# Altium PCB Relay-Driver10A.PcbDoc (part 1 of 3)
Units mil, origin at the board's own origin, x right, y up, seen from the top; angles counter-clockwise.
Board outline 10588 x 8047 mil, 4 copper layers (Top Layer, Layer 1, Layer 2, Bottom Layer), stack 61.653 mil thick; 39 components, 30 nets, 139 pads, 350 vias.
Unrouted connection lines stored in the file: 118.
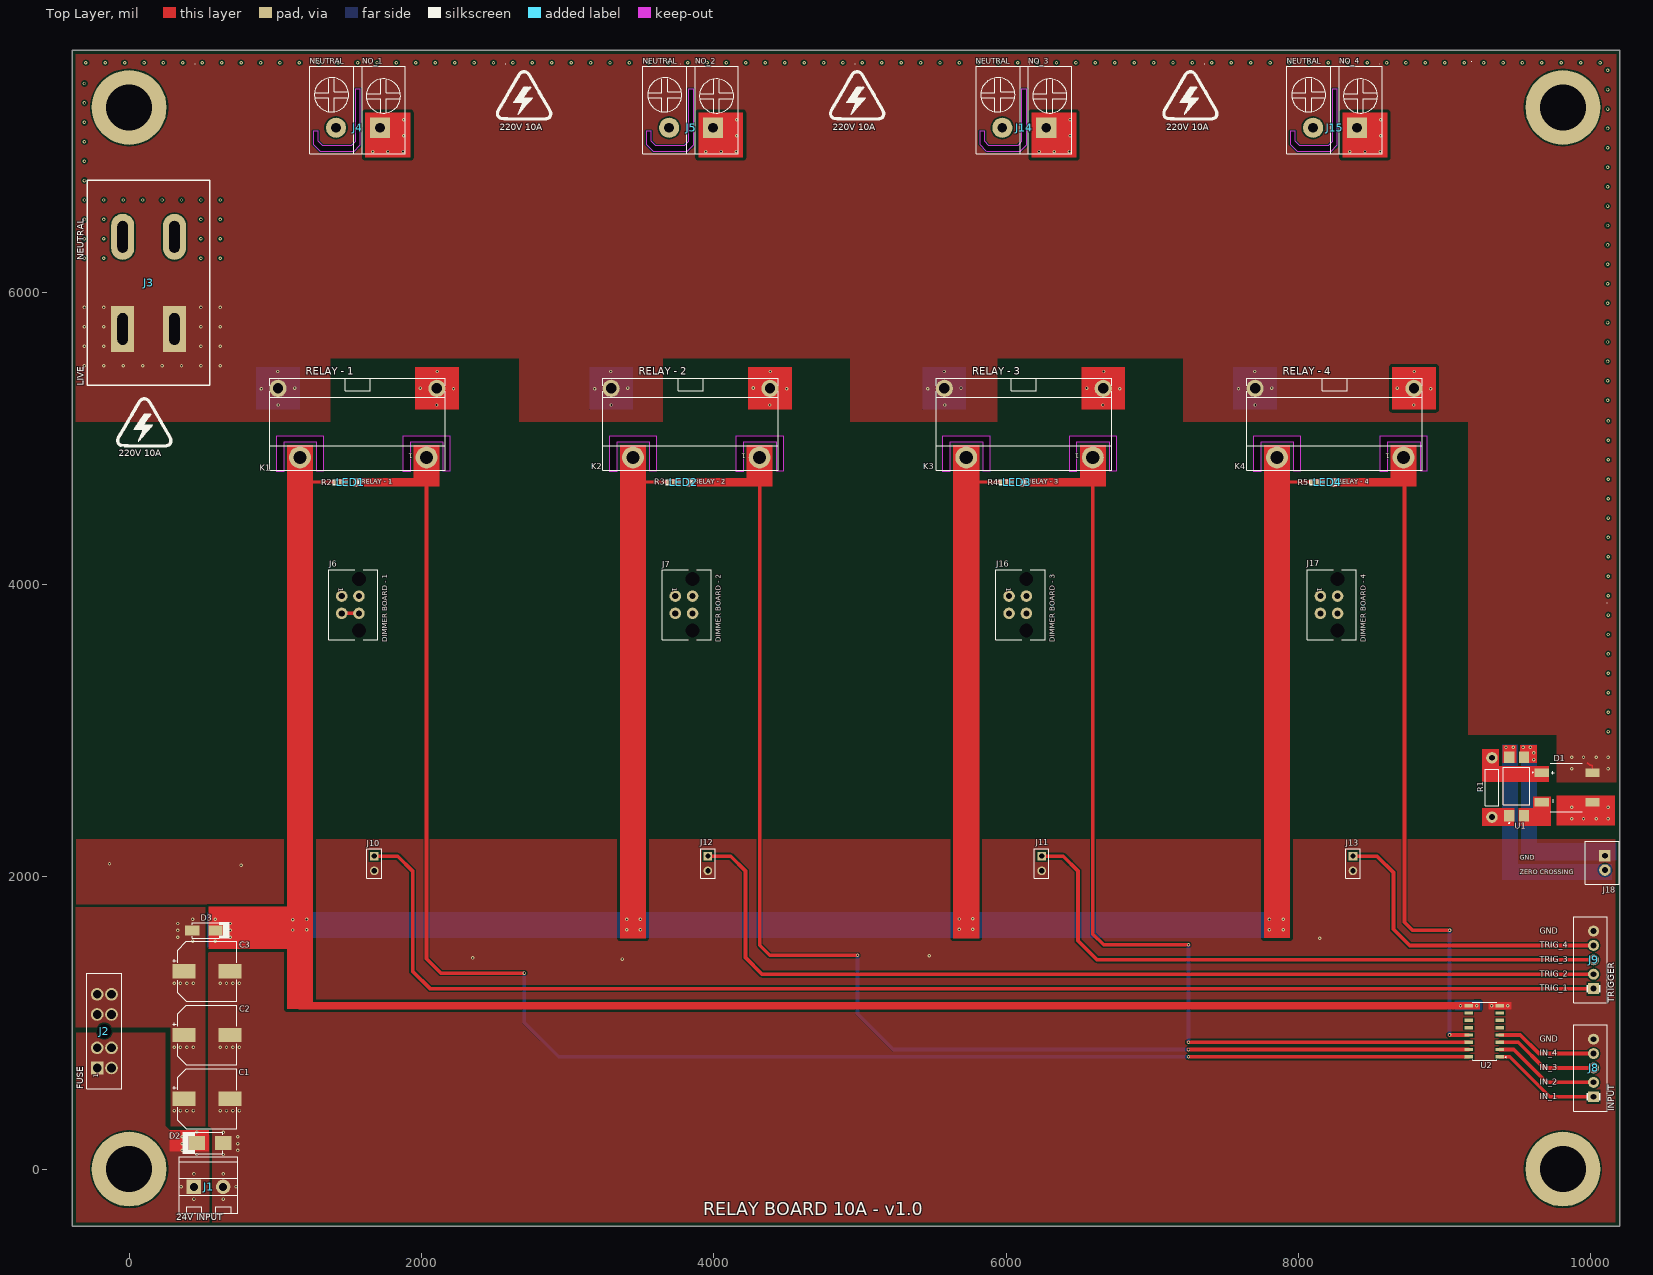
[diagram p0: Top Layer view]
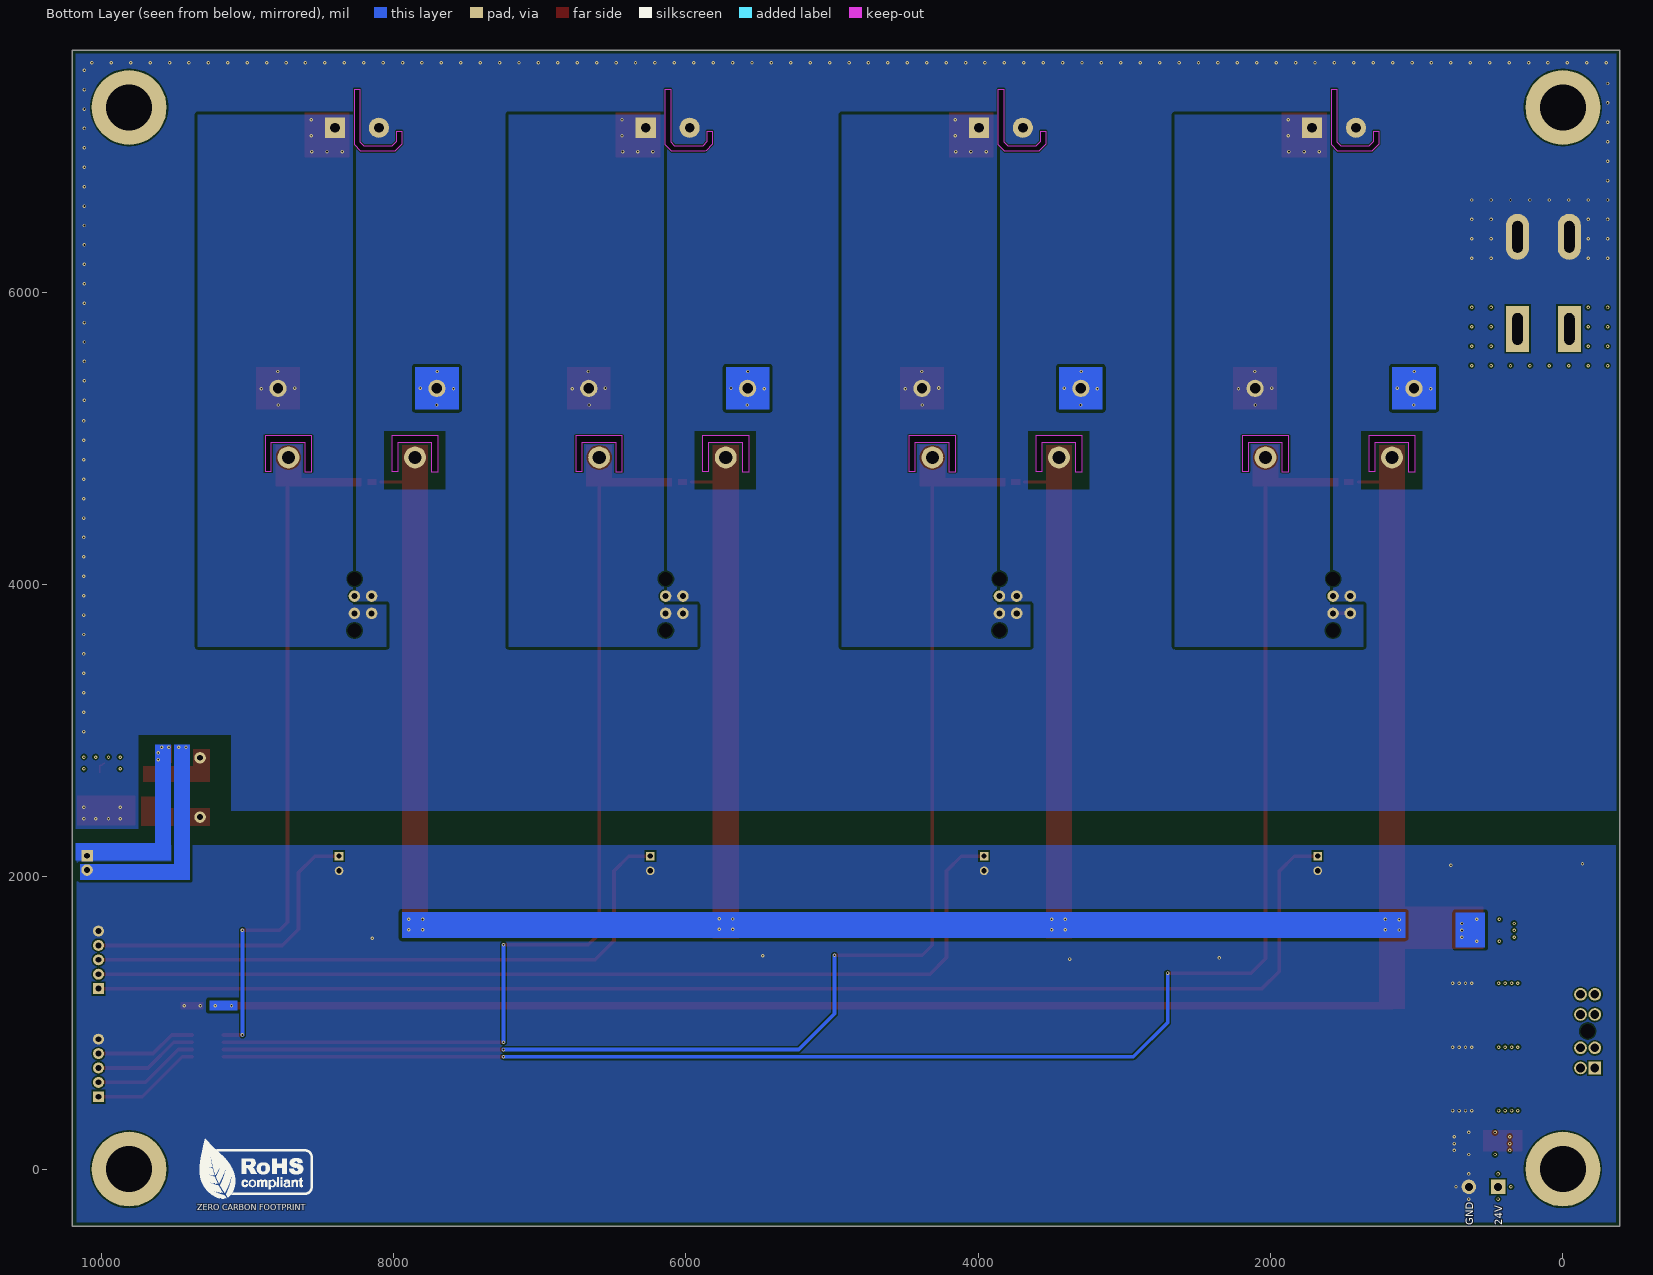
[diagram p1: Bottom Layer view, seen from below]
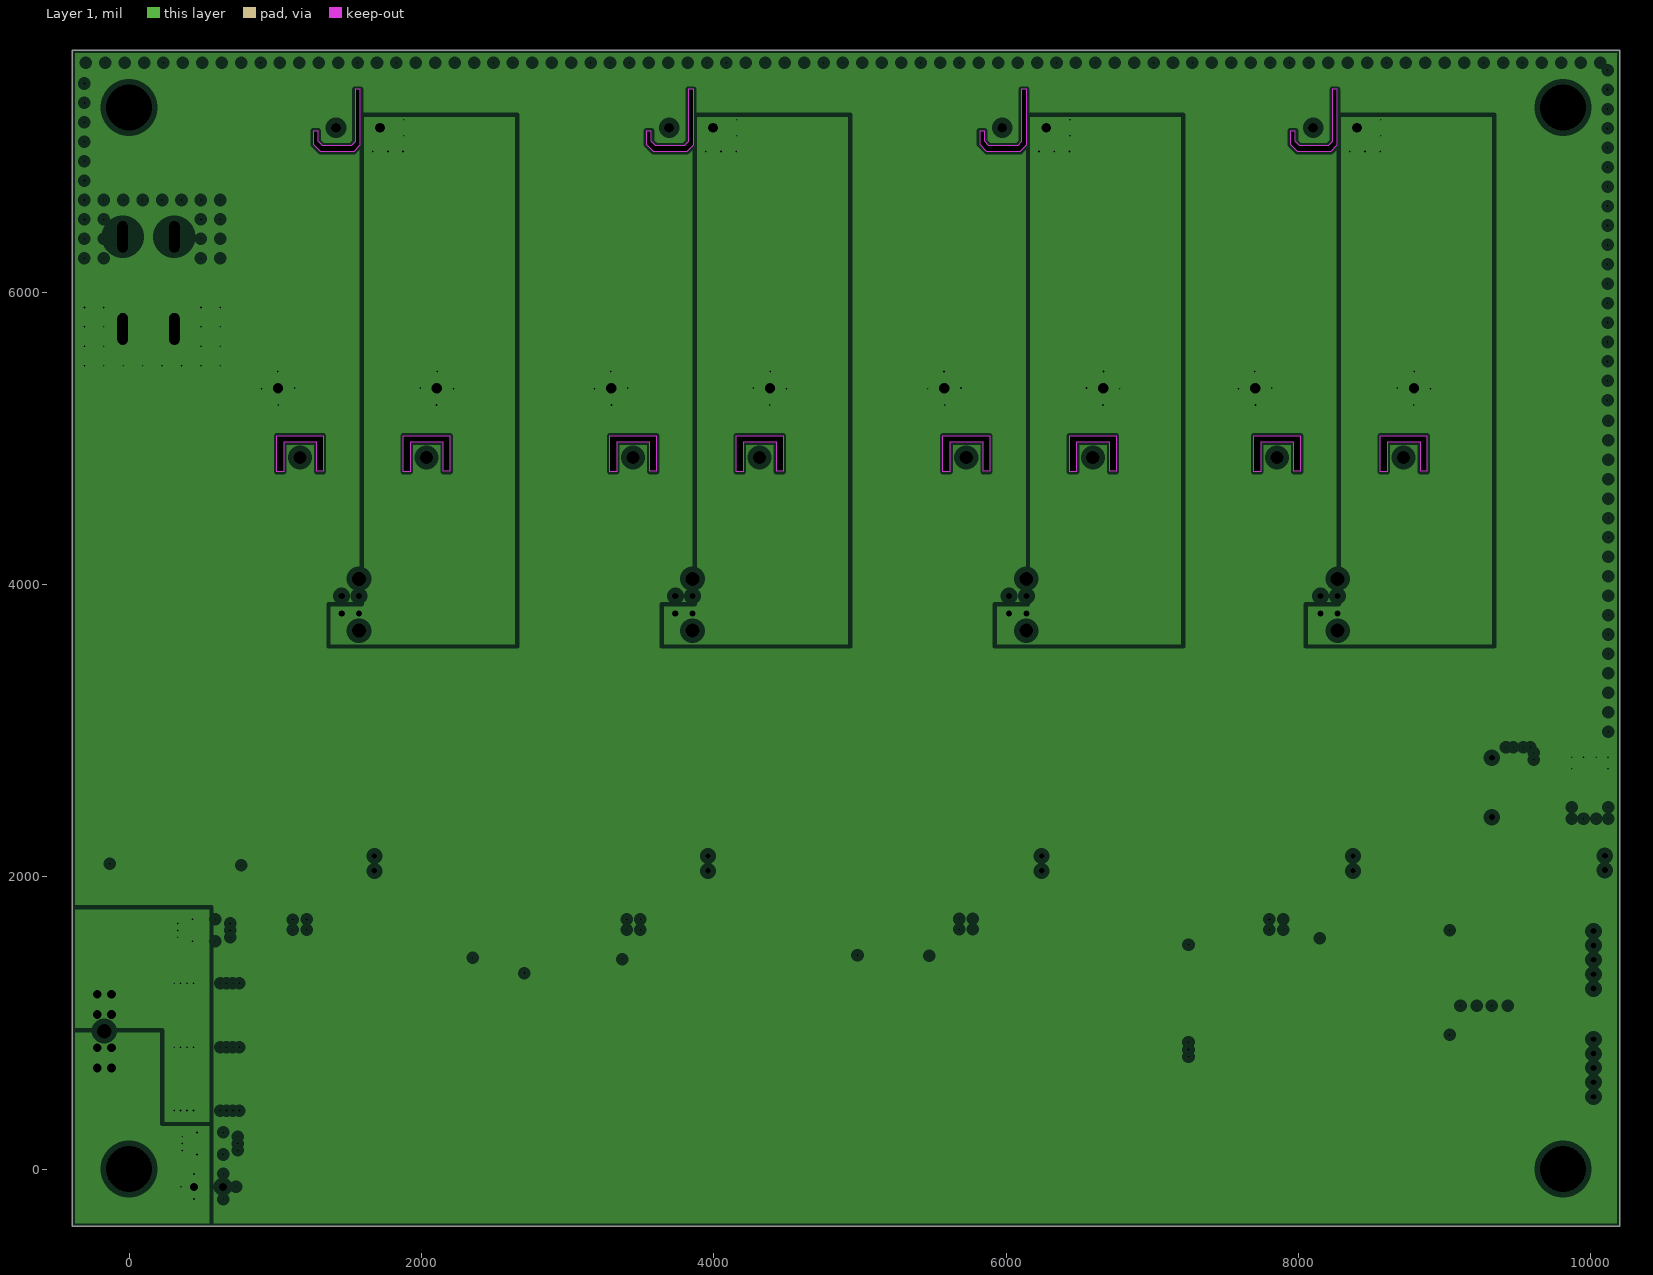
[diagram p2: Layer 1, clearances drawn from the general rule]
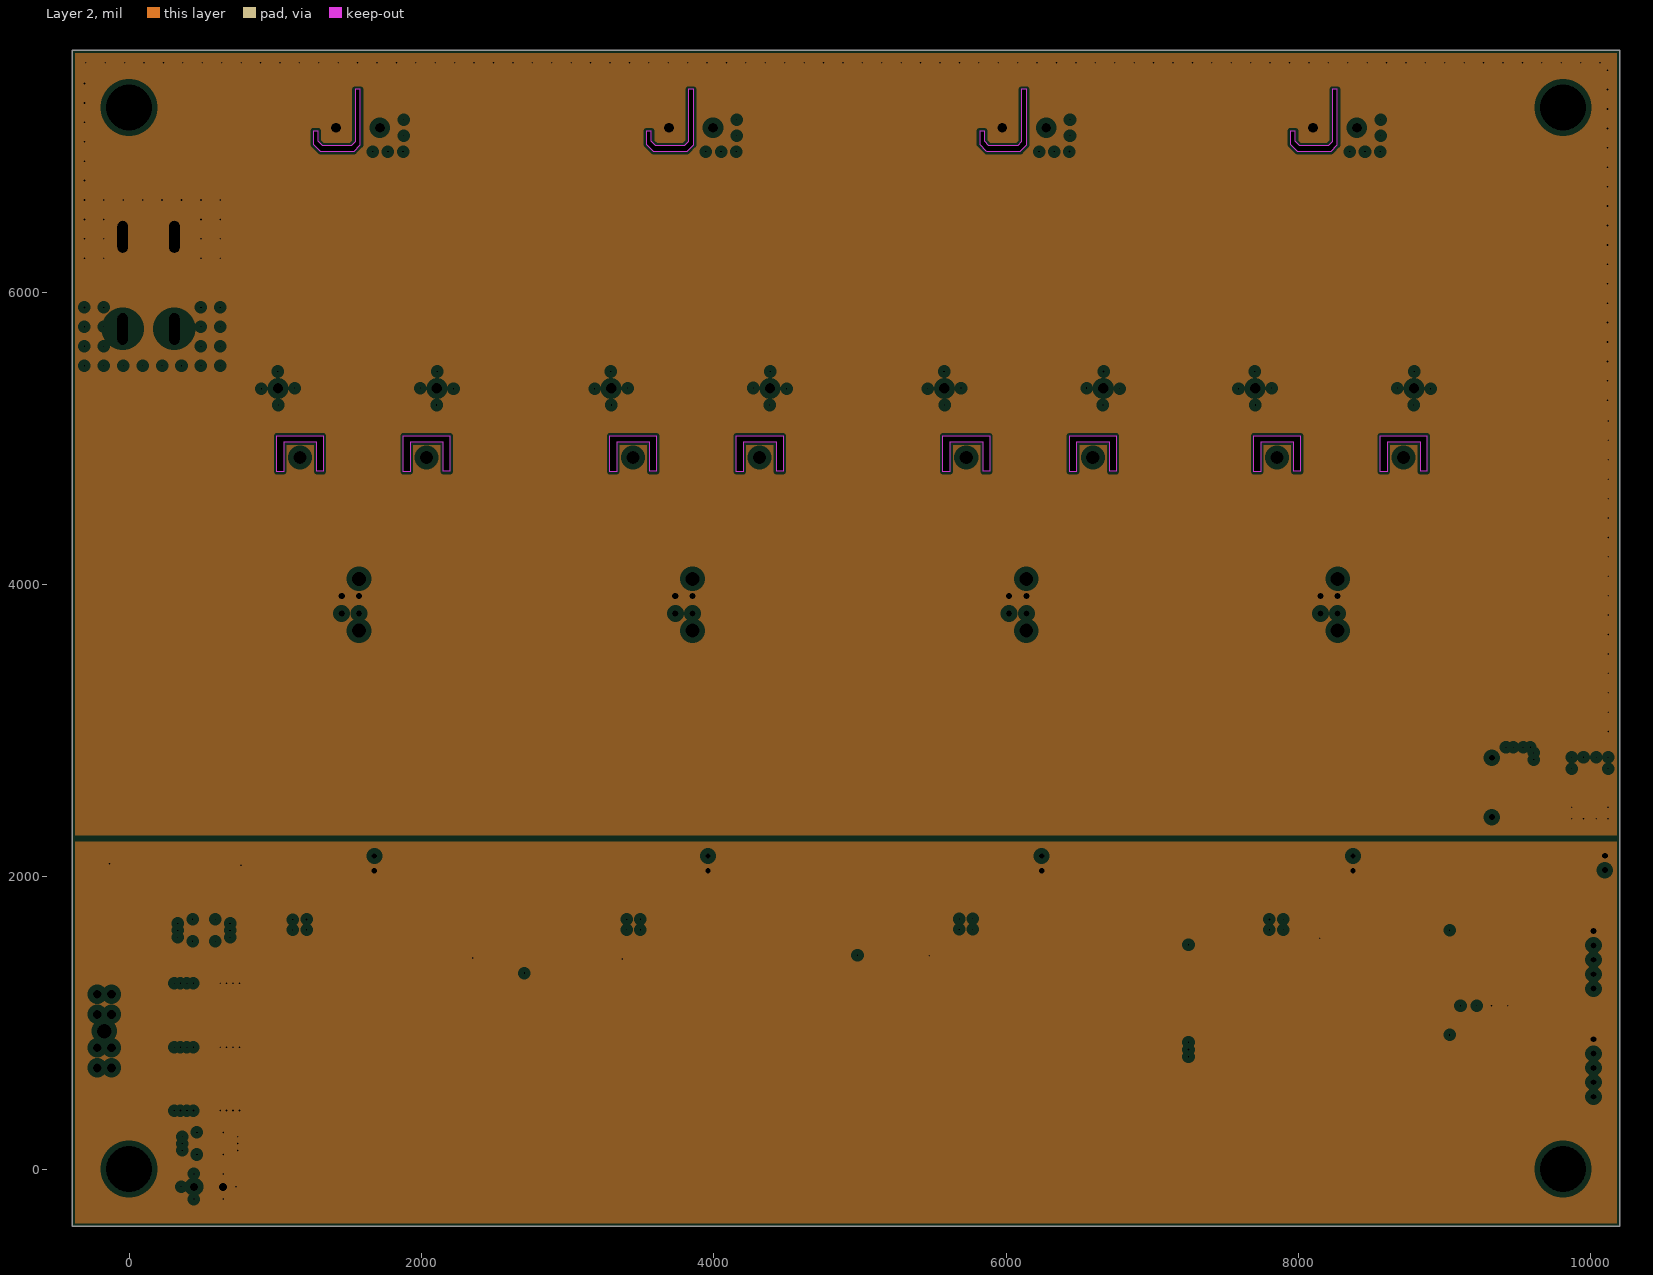
[diagram p3: Layer 2, clearances drawn from the general rule]
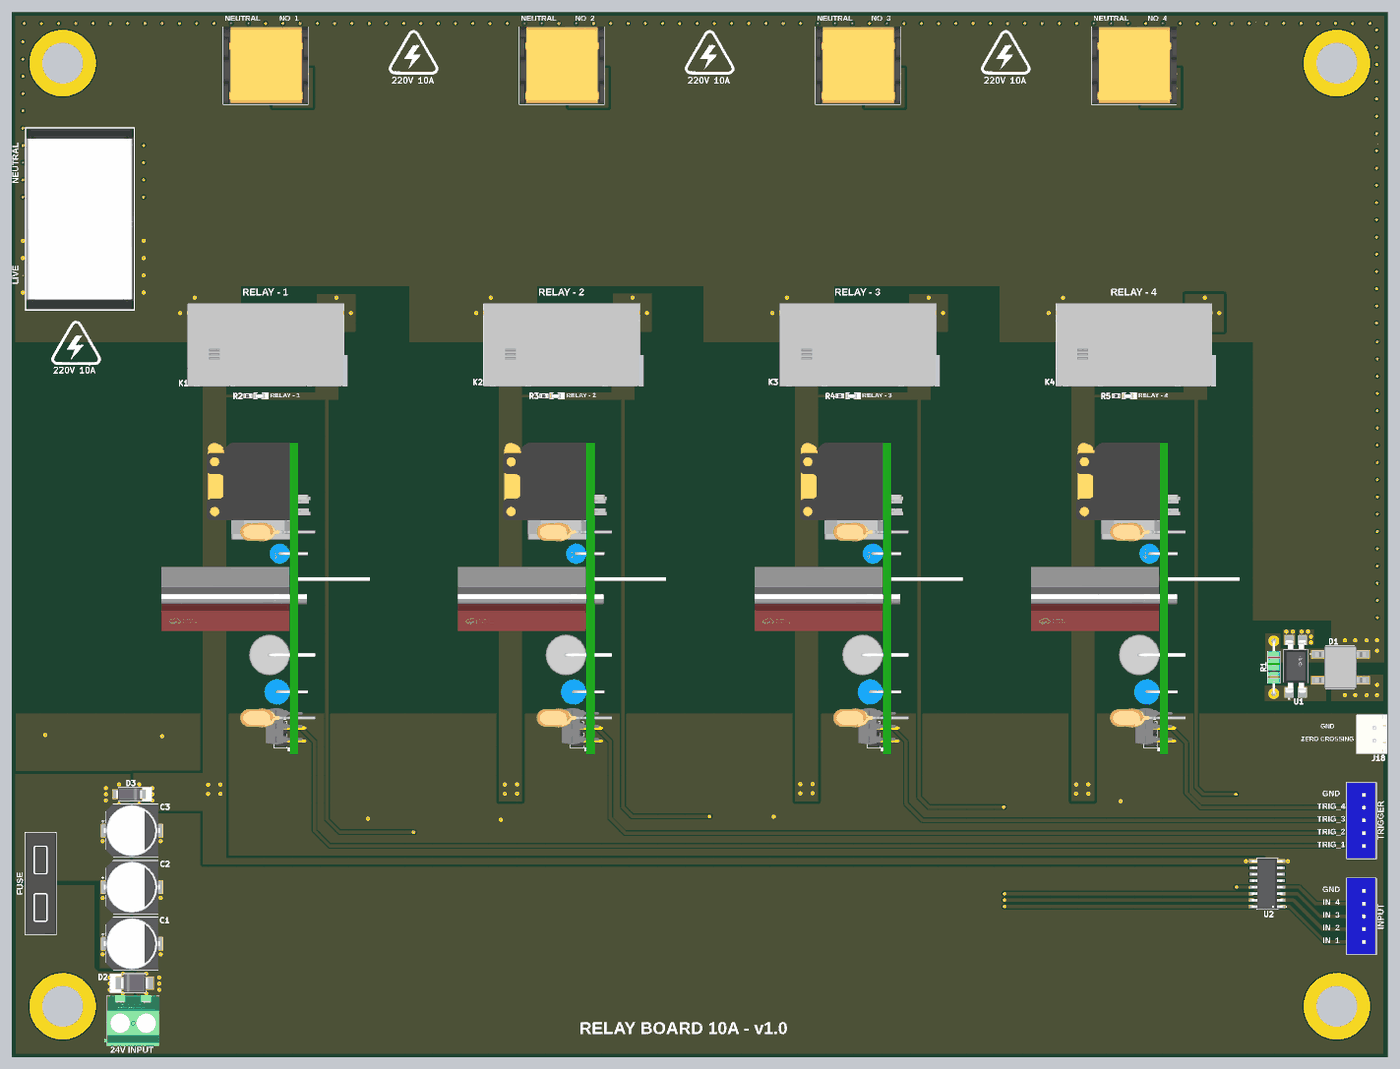
[diagram p5: 3D render of the assembled board from above, using the file's embedded part models]

## Layer stack, top to bottom
Top Solder: solder mask 0.4, Solder Resist, Dk 3.5
Top Layer: signal copper 1.378
Dielectric 2: prepreg 7.992, PP-006, Dk 4.4
Layer 1: plane copper 1.181, net LIVE
Dielectric 1: core 40.551, FR-4, Dk 4.6
Layer 2: plane copper 1.181, net NEUTRAL
Dielectric 3: prepreg 7.992, PP-006, Dk 4.4
Bottom Layer: signal copper 1.378
Bottom Solder: solder mask 0.4, Solder Resist, Dk 3.5

## Board outline
-390,-392 -390,7655 10198,7655 10198,-392
cut-out: 7693.23,4771.73 7693.23,5015.73 8012.23,5015.73 8012.23,4772.73 7968.23,4772.73 7968.23,4973 7740.23,4973 7740.23,4771.73
cut-out: 5567.56,4771.73 5567.56,5015.73 5886.56,5015.73 5886.56,4772.73 5842.56,4772.73 5842.56,4973 5614.56,4973 5614.56,4771.73
cut-out: 3287.9,4771.73 3287.9,5015.73 3606.9,5015.73 3606.9,4772.73 3562.9,4772.73 3562.9,4973 3334.9,4973 3334.9,4771.73
cut-out: 1009.23,4771.73 1009.23,5015.73 1328.23,5015.73 1328.23,4772.73 1284.23,4772.73 1284.23,4973 1056.23,4973 1056.23,4771.73
cut-out: 8559.37,4771.73 8559.37,5015.73 8878.37,5015.73 8878.37,4772.73 8834.37,4772.73 8834.37,4973 8606.37,4973 8606.37,4771.73
cut-out: 6433.7,4771.73 6433.7,5015.73 6752.7,5015.73 6752.7,4772.73 6708.7,4772.73 6708.7,4973 6480.7,4973 6480.7,4771.73
cut-out: 4154.03,4771.73 4154.03,5015.73 4473.03,5015.73 4473.03,4772.73 4429.03,4772.73 4429.03,4973 4201.03,4973 4201.03,4771.73
cut-out: 1259.57,7011.47 1303.37,6967.67 1308.37,6962.67 1538.67,6962.67 1582.33,7006.33 1582.33,7386.67 1546,7386.67 1546,7028 1519,7001 1323,7001 1294,7030 1294,7101 1259.57,7101
cut-out: 3538.24,7011.47 3582.04,6967.67 3587.04,6962.67 3817.33,6962.67 3861,7006.33 3861,7386.67 3824.67,7386.67 3824.67,7028 3797.67,7001 3601.67,7001 3572.67,7030 3572.67,7101 3538.24,7101
cut-out: 5817.9,7011.47 5861.71,6967.67 5866.71,6962.67 6097,6962.67 6140.67,7006.33 6140.67,7386.67 6104.33,7386.67 6104.33,7028 6077.33,7001 5881.33,7001 5852.33,7030 5852.33,7101 5817.9,7101
cut-out: 1875.37,4771.73 1875.37,5015.73 2194.37,5015.73 2194.37,4772.73 2150.37,4772.73 2150.37,4973 1922.37,4973 1922.37,4771.73
cut-out: 7943.57,7011.47 7987.37,6967.67 7992.37,6962.67 8222.67,6962.67 8266.33,7006.33 8266.33,7386.67 8230,7386.67 8230,7028 8203,7001 8007,7001 7978,7030 7978,7101 7943.57,7101

## Design rules (kind name [scope] priority, off if disabled: settings)
Clearance [All] p1: gap=10 ignorepadtopadclearanceinfootprint=FALSE except(5: Track-Track SMDPad-Hole; 7: Track-SMDPad SMDPad-SMDPad SMDPad-Fill SMDPad-Poly; 8: Track-THPad Track-Fill; 20: Fill-Fill Fill-Poly Poly-Poly)
DiffPairsRouting RS485 [InDifferentialPairClass('RS485_LINES')] p1: maxlimit=10 minlimit=10 mostfreqgap=10 toplayer_minwidth=7 toplayer_maxwidth=7 toplayer_prefwidth=7 bottomlayer_minwidth=7 bottomlayer_maxwidth=7 bottomlayer_prefwidth=7 impedanceprofiledriven=TRUE impedanceprofileid={B24DC8C0-97AA-4CE8-8EEA-479133B3B4E6} impedanceprofilevalue=120.000000 maxuncoupledlength=500
DiffPairsRouting HDMI-RXA [InDifferentialPair('RXA')] p2: maxlimit=5 minlimit=5 mostfreqgap=5 toplayer_minwidth=7 toplayer_maxwidth=7 toplayer_prefwidth=7 bottomlayer_minwidth=7 bottomlayer_maxwidth=7 bottomlayer_prefwidth=7 impedanceprofiledriven=TRUE impedanceprofileid={BD5B4000-3273-4A46-BF1E-3F54DBEA6FF5} impedanceprofilevalue=100.000000 maxuncoupledlength=500
DiffPairsRouting HDMI-RXB [InDifferentialPair('RXB')] p3: maxlimit=5 minlimit=5 mostfreqgap=5 toplayer_minwidth=7 toplayer_maxwidth=7 toplayer_prefwidth=7 bottomlayer_minwidth=7 bottomlayer_maxwidth=7 bottomlayer_prefwidth=7 impedanceprofiledriven=TRUE impedanceprofileid={BD5B4000-3273-4A46-BF1E-3F54DBEA6FF5} impedanceprofilevalue=100.000000 maxuncoupledlength=500
DiffPairsRouting HDMI-TXA [InDifferentialPair('TXA')] p4: maxlimit=5 minlimit=5 mostfreqgap=5 toplayer_minwidth=7 toplayer_maxwidth=7 toplayer_prefwidth=7 bottomlayer_minwidth=7 bottomlayer_maxwidth=7 bottomlayer_prefwidth=7 impedanceprofiledriven=TRUE impedanceprofileid={BD5B4000-3273-4A46-BF1E-3F54DBEA6FF5} impedanceprofilevalue=100.000000 maxuncoupledlength=500
DiffPairsRouting HDMI-TXB [InDifferentialPair('TXB')] p5: maxlimit=5 minlimit=5 mostfreqgap=5 toplayer_minwidth=7 toplayer_maxwidth=7 toplayer_prefwidth=7 bottomlayer_minwidth=7 bottomlayer_maxwidth=7 bottomlayer_prefwidth=7 impedanceprofiledriven=TRUE impedanceprofileid={BD5B4000-3273-4A46-BF1E-3F54DBEA6FF5} impedanceprofilevalue=100.000000 maxuncoupledlength=500
Height [All] p1: minheight=0 maxheight=10000 prefheight=500
HoleSize [All] p1: absolutevalues=TRUE maxlimit=10000 minlimit=1 maxpercent=80.000 minpercent=20.000
HoleToHoleClearance [All] p1: gap=0 allowstackedmicrovias=TRUE
MinimumSolderMaskSliver [All] p1: minsoldermaskwidth=0
PlaneClearance [All] p1: clearance=37
PlaneConnect [All] p1: planeconnectstyle=Direct reliefexpansion=20 reliefentries=4 reliefconductorwidth=10 reliefairgap=10
PolygonConnect [All] p1: connectstyle=Direct reliefconductorwidth=15 reliefentries=4 polygonreliefangle="45 Angle" airgapwidth=10
RoutingVias [All] p1: holewidth=11.81 width=23.62 viastyle="Through Hole" minholewidth=11.81 minwidth=23.62 maxholewidth=11.81 maxwidth=23.62
SilkToSilkClearance [All] p1: silktosilkclearance=0
SilkToSolderMaskClearance [IsPad] p1: minsilkscreentomaskgap=0 clearancetoexposedcopper=TRUE
SolderMaskExpansion [All] p1: expansion=4 istentingtop=FALSE
UnRoutedNet [All] p1: checkbadconnections=TRUE
Width [All] p1: maxlimit=50 minlimit=7 preferedwidth=12 minimp=50.000000 maximp=50.000000 favimp=50.000000
20 further rules are at their usual default settings.

## Components (designator, comment, footprint, x,y, rotation, side; value= is the part's Value field where it differs from the comment)
C1 "220uF" UCD-220uF-10mmDia 533.14,482 r0 top locked
C2 "220uF" UCD-220uF-10mmDia 533.14,917.5 r0 top locked
C3 "220uF" UCD-220uF-10mmDia 533.14,1353 r0 top locked
D1 "DF10S" DF10S 9837,2610.81 r0 top locked
D2 "SMBJ28A-13-F" SMB_ 553.33,179 r180 top locked value=330pF
D3 "SS56" SMA 511.61,1633 r180 top locked
J1 "1715721" 1715721 543,-121 r0 top locked
J2 "178.6165.0002" 178.6165.0002 -169.79,943.97 r90 top locked
J3 "KF88SA-16.0-2P" KF88SA-16.0-2P 132.83,6063.04 r90 top locked
J4 "DBT50G-7.62-2P-BK-P" DBT50G-7.62-2P-BK-P 1565.15,7124 r180 top locked
J5 "DBT50G-7.62-2P-BK-P" DBT50G-7.62-2P-BK-P 3843.81,7124 r180 top locked
J6 "0447690401" 0447690401 1513,3861 r270 top locked
J7 "0447690401" 0447690401 3795.33,3861 r270 top locked
J8 "B5B-XH-A(LF)(SN)" B5B-XH-A(LF)(SN)_ 10017.88,692.15 r90 top locked
J9 "B5B-XH-A(LF)(SN)" B5B-XH-A(LF)(SN)_ 10017.88,1431.85 r90 top locked
J10 "X6511FV-02-C85D32" "HDR1X2 (Female)" 1677,2091 r270 top locked
J11 "X6511FV-02-C85D32" "HDR1X2 (Female)" 6242.66,2091 r270 top locked
J12 "X6511FV-02-C85D32" "HDR1X2 (Female)" 3959.33,2091 r270 top locked
J13 "X6511FV-02-C85D32" "HDR1X2 (Female)" 8372,2091 r270 top locked
J14 "DBT50G-7.62-2P-BK-P" DBT50G-7.62-2P-BK-P 6123.48,7124 r180 top locked
J15 "DBT50G-7.62-2P-BK-P" DBT50G-7.62-2P-BK-P 8249.15,7124 r180 top locked
J16 "0447690401" 0447690401 6078.66,3861 r270 top locked
J17 "0447690401" 0447690401 8208,3861 r270 top locked
J18 "B2B-XH-A(LF)(SN)" B2B-XH-A(LF)(SN)_ 10096,2095 r270 top locked
K1 "G4A-1A-PE DC24" "G4A-1A-PE DC24" 1562,5105 r180 top locked
K2 "G4A-1A-PE DC24" "G4A-1A-PE DC24" 3840.66,5105 r180 top locked
K3 "G4A-1A-PE DC24" "G4A-1A-PE DC24" 6120.33,5105 r180 top locked
K4 "G4A-1A-PE DC24" "G4A-1A-PE DC24" 8246,5105 r180 top locked
LED1 "Blue" LED-0603 1515.68,4700 r0 top locked
LED2 "Blue" LED-0603 3794.31,4700 r0 top locked
LED3 "Blue" LED-0603 6074,4700 r0 top locked
LED4 "Blue" LED-0603 8200.31,4700 r0 top locked
R1 "100K" MFR50SJT-52-100K 9323,2610.81 r270 top locked
R2 "3.3K" Res-0402 1425.68,4700 r0 top locked
R3 "3.3K" Res-0402 3704.31,4700 r0 top locked
R4 "3.3K" Res-0402 5983,4700 r0 top locked
R5 "3.3K" Res-0402 8107.31,4700 r0 top locked
U1 "PC817C" PC817C 9492,2618.19 r90 top locked
U2 "ULN2003AIDR" "16-SOIC (0.154\", 3.90mm Width)" 9271,943 r180 top locked

## Footprints (in the part's own frame and the unit in brackets; to place one, negate y for a bottom-side part, rotate by r counter-clockwise, add the part's x,y. Pads: shape width x height; smd on the part's side, far side on the other; paste and mask are expansions set on the pad)
"16-SOIC (0.154\", 3.90mm Width)" [mm]
  rect 1.5x0.58 smd: 1(-2.7,4.445) 2(-2.7,3.175) 3(-2.7,1.905) 4(-2.7,0.635) 5(-2.7,-0.635) 6(-2.7,-1.905) 7(-2.7,-3.175) 8(-2.7,-4.445) 9(2.7,-4.445) 10(2.7,-3.175) 11(2.7,-1.905) 12(2.7,-0.635) 13(2.7,0.635) 14(2.7,1.905) 15(2.7,3.175) 16(2.7,4.445)
  silkscreen extent -3.78,-5.03 2,5.03, body extent -3,-4.95 3,4.95, height 1.75
178.6165.0002 [mm]
  rect 2.2x2.2 hole 1.5 paste-2539.97 mask+0.051: 1(-6.4,1.25)
  round 2.2 hole 1.5 paste-2539.97 mask+0.051: 2(-2.9,1.25) 3(2.9,1.25) 4(6.4,1.25) 5(6.4,-1.25) 6(2.9,-1.25) 7(-2.9,-1.25) 8(-6.4,-1.25)
  round 0 hole 2.5 unplated paste-2539.97: ""(0,0)
  silkscreen extent -10.03,-3.05 10.03,3.05, body extent -10,-3 10,3, height 17.5
1715721 [mm]
  rect 2.5x2.5 hole 1.4 paste+0 mask+0.051: 1(-2.54,0)
  round 2.5 hole 1.4 paste+0 mask+0.051: 2(2.54,0)
  silkscreen extent -5.08,-4.62 5.08,5.18, body extent -5.64,-4.62 5.09,5.21, height 14.2
0447690401 [mil]
  round 78.74 hole 42: 1(-59,-59) 2(59,-59) 3(-59,59) 4(59,59)
  round 0 hole 94.49 unplated paste-57.5 mask-57.5: 5(-177,59) 6(177,59)
  silkscreen extent -239,-149 239,187, body extent -482,-753 1920,851, height 1646
B2B-XH-A(LF)(SN)_ [mm]
  rect 2x2 hole 1: 1(-1.25,0)
  round 2 hole 1: 2(1.25,0)
  silkscreen extent -3.78,-3.43 3.74,2.44, body extent -3.72,-3.37 3.68,2.38, height 7
B5B-XH-A(LF)(SN)_ [mm] "XH Header Male Pin 0.098\"(2.50mm) 5 Through Hole,P=2.5mm Wire To Board / Wire To Wire Connector RoHS"
  rect 1.9x1.9 hole 1: 1(-5,0)
  round 1.9 hole 1: 2(-2.5,0) 3(0,0) 4(2.5,0) 5(5,0)
  silkscreen extent -7.49,-2.39 7.47,3.45, body extent -7.45,-2.34 7.45,3.41, height 7
DBT50G-7.62-2P-BK-P [mm]
  rect 3.5x3.5 hole 1.7: 1(-3.81,0)
  round 3.5 hole 1.7: 2(3.81,0)
  silkscreen extent -8.22,-10.65 8.38,4.55, body extent -8.25,-10.67 8.25,4.53, height 16.3
DF10S [mm]
  rect 2.5x1.5 smd: 1(-4.41,2.55) 2(-4.41,-2.55) 3(4.41,-2.55) 4(4.41,2.55)
  silkscreen extent -5.97,-4.17 2.68,4.17, body extent -4.95,-4.11 4.95,4.11, height 3.41
"G4A-1A-PE DC24" [mm]
  round 3.8 hole 2.3 paste+0 mask+0.051: 1(-12,6) 2(10,6)
  round 3 hole 1.8 paste+0 mask+0.051: 3(13.8,-6) 4(-13.8,-6)
  silkscreen extent -15.25,-7.75 15.25,8.25, body extent -15.25,-7.8 15.25,8.2, height 26.8
"HDR1X2 (Female)" [mm]
  rect 1.5x1.5 hole 0.9: 1(-1.27,0)
  round 1.5 hole 0.9: 2(1.27,0)
  silkscreen extent -2.54,-1.27 2.54,1.27, body extent -2.54,-1.27 2.54,1.27, height 8.8
KF88SA-16.0-2P [mm]
  rect 8x4 hole 1.8 slot 5.5 at 0 deg: 1(-8,-4.5) 1(-8,4.5)
  oval 8x4 hole 1.8 slot 5.5 at 0 deg: 2(8,-4.5) 2(8,4.5)
  silkscreen extent -17.83,-10.63 17.83,10.63, body extent -17.7,-10.5 17.7,10.5, height 26.9
LED-0603 [mm]
  rect 0.5x1 smd: 1(-0.75,0) 2(0.75,0)
  silkscreen extent -1.12,-0.66 1.75,0.66, body extent -0.82,-0.37 0.82,0.36, height 0.68
MFR50SJT-52-100K [mm]
  round 2 hole 1 paste+0 mask+0.051: 1(-5.15,0) 2(5.15,0)
  silkscreen extent -3.15,-1.2 3.15,1.2, body extent -5.43,-1.19 5.43,1.19, height 2.4
PC817C [mm]
  rect 2x1.8 smd paste+0 mask+0.051: 1(-5.1,1.27) 2(-5.1,-1.27) 3(5.1,-1.27) 4(5.1,1.27)
  silkscreen extent -6.4,-2.29 3.32,2.31, body extent -5.15,-2.3 5.15,2.3, height 4.64
Res-0402 [mil]
  rect 18x25 smd mask+2.17: 1(-18.5,0) 2(18.5,0)
  silkscreen extent -32,-17 32,16, body extent -23,-11 23,11, height 16
SMA [mm]
  rect 2.5x1.7 smd: 1(-2,0) 2(2,0)
  silkscreen extent -4.45,-1.42 2.06,1.42, body extent -2.6,-1.3 2.6,1.3, height 2.4
SMB_ [mm]
  rect 2.8x2.4 smd: 1(-2.3,0) 2(2.3,0)
  silkscreen extent -2.21,-1.91 4.83,1.9, body extent -2.7,-1.8 2.7,1.8, height 2.3
UCD-220uF-10mmDia [mm] "0.406\" L x 0.406\" W (10.30mm x 10.30mm)"
  rect 4x2.5 smd: 1(-4,0) 2(4,0)
  silkscreen extent -5.95,-5.21 5.13,5.21, body extent -5.45,-5.15 5.45,5.15, height 10.8

## Part data
C1 C2 C3: library part UCD1H221MNL1GS, "CAP ALUM 220UF 20% 50V SMD", Case/Package=Radial, LCSC Part Number=C116211, Leakage Current=3uA, Manufacturer=Nichicon, Max Operating Temperature=105°C, Min Operating Temperature=-55°C, Package Quantity=1, Ripple Current=700mA, Supplier Part Number 1=493-6390-1-ND, Tolerance=20%, Voltage=50V, Capacitance=220uF, Category="Aluminum Electrolytic Capacitors", ComponentLink1Description=https://datasheet.ciiva.com/11776/0900766b80ebdadd-11776792.pdf?src-supplier=RSComponents, ComponentLink1URL=https://datasheet.ciiva.com/11776/0900766b80ebdadd-11776792.pdf?src-supplier=RSComponents, ComponentLink2Description=https://datasheet.ciiva.com/5362/e-cd-22158-5362489.pdf?src-supplier=Mouser, ComponentLink2URL=https://datasheet.ciiva.com/5362/e-cd-22158-5362489.pdf?src-supplier=Mouser, ComponentLink3Description=https://datasheet.ciiva.com/11684/e-cd-11684678.pdf?src-supplier=Avnet, ComponentLink3URL=https://datasheet.ciiva.com/11684/e-cd-11684678.pdf?src-supplier=Avnet, ComponentLink4Description=https://datasheet.ciiva.com/15037/e-cd-15037119.pdf?src-supplier=Digi-Key, ComponentLink4URL=https://datasheet.ciiva.com/15037/e-cd-15037119.pdf?src-supplier=Digi-Key, ComponentLink5Description=https://datasheet.ciiva.com/16393/e-cd-16393493.pdf?src-supplier=Future+Electronics, ComponentLink5URL=https://datasheet.ciiva.com/16393/e-cd-16393493.pdf?src-supplier=Future+Electronics, ComponentLink6Description=https://datasheet.ciiva.com/17354/e-cd-17354606.pdf?src-supplier=Avnet+Europe, ComponentLink6URL=https://datasheet.ciiva.com/17354/e-cd-17354606.pdf?src-supplier=Avnet+Europe, Construction=Cylindrical, Diameter=10mm, Dissipation Factor=0.1%, Features="General Purpose", Height=10mm, Height - Seated (Max)=0.394inch, Impedance=160mR, Item Type=Capacitor, Lead Free="Lead Free", Length=10mm, Life (Hours)=5000Hour, Manufacturer Part Number=UCD1H221MNL1GS, Mount="Surface Mount,PCB", Packaging="Tape and Reel", Pricing 1="1=0.85000, 10=0.60200, 50=0.45480, 100=0.39620 (USD)", Radiation Hardening=No, RoHS=Yes, RoHS Compliant=Yes, Series=CD, Supplier 1=Digi-Key, Termination=SMD/SMT, Voltage Rating=50V, Voltage Rating (DC)=50V
D1: "50A 1.1V@1A 1A 1kV DBS Bridge Rectifiers ROHS", LCSC Part Number=C5174636, Manufacturer=MSKSEMI, Package=DBS, ComponentLink1Description=LCSC, ComponentLink1URL=https://www.lcsc.com/product-detail/Bridge-Rectifiers_MSKSEMI-DF10S_C5174636.html, Item Type="Bridge Rectifier", Manufacturer Part Number=DF10S
D2: "TVS DIODE 28VWM 45.4VC SMB", Breakdown Voltage=35.8V, Case/Package=SMB, Clamping Voltage=45.4V, Forward Voltage=5V, Leakage Current=5uA, Manufacturer=Diodes, Max Operating Temperature=150°C, Max Output current=13.2A, Max Power Dissipation=600W, Min Breakdown Voltage=31.1V, Min Operating Temperature=-55°C, Package Quantity=3000, Power Line Protection=No, Reverse Standoff Voltage=28V, Supplier Part Number=8797342, Test Current=1mA, Category="TVS Diodes", Clamping Voltage-Max=45.4V, ComponentLink1Description=https://datasheet.ciiva.com/16387/ds19002-16387564.pdf?src-supplier=Future+Electronics, ComponentLink1URL=https://datasheet.ciiva.com/16387/ds19002-16387564.pdf?src-supplier=Future+Electronics, ComponentLink2Description=https://datasheet.ciiva.com/26912/getdatasheetpartid-234000-26912533.pdf?src-supplier=Verical, ComponentLink2URL=https://datasheet.ciiva.com/26912/getdatasheetpartid-234000-26912533.pdf?src-supplier=Verical, Diode Type=ZENER, Direction=Unidirectional, Height=2.62mm, Item Type=Diode, Lead Free="Lead Free", Length=4.57mm, Manufacturer Part Number=SMBJ28A-13-F, Max Breakdown Voltage=35.8V, Max Reverse Leakage Current=5uA, Max Surge Current=13.2A, Mounting Technology="Surface Mount", Number of Elements=1, Number of Unidirectional Channels=1, Packaging="Tape and Reel", Peak Pulse Current=13.2A, Peak Pulse Power=600W, Pins=2, Polarity=Unidirectional, Power Dissipation=600W, Pricing="3000=0.0734, 9000=0.0706, 15000=0.0693, 30000=0.0676, 60000=0.065 (USD)", Radiation Hardening=No, Reverse Breakdown Voltage=31.1V, RoHS=Yes, RoHS Compliant=Yes, Series=SMBJ, Stock=39000, Supplier="Future Electronics", Termination=SMD/SMT, Voltage Rating (DC)=28V, Width=3.9mm, Working Voltage=28V
D3: "DIODE SCHOTTKY 60V 5A SMA", LCSC Par Number=C65009, Manufacturer=MDD, ComponentLink1Description=LCSC, ComponentLink1URL=https://www.lcsc.com/product-detail/Schottky-Barrier-Diodes-SBD_MDD-Microdiode-Electronics-SS56_C65009.html, Iterm Type=Diode, Manufacturer Part Number=SS56
J1: "TERM BLK 2P SIDE ENT 5.08MM PCB", Manufacturer="Phoenix Contact", Supplier Part Number=277-1263-ND, ComponentLink1Description=https://datasheet.ciiva.com/1120/1697161-1120393.pdf?src-supplier=Farnell, ComponentLink1URL=https://datasheet.ciiva.com/1120/1697161-1120393.pdf?src-supplier=Farnell, ComponentLink2Description=https://datasheet.ciiva.com/832/1715721-832095.pdf?src-supplier=Digikey, ComponentLink2URL=https://datasheet.ciiva.com/832/1715721-832095.pdf?src-supplier=Digikey, ComponentLink3Description=https://datasheet.ciiva.com/15169/getdatasheetpartid-212174-15169929.pdf?src-supplier=Verical, ComponentLink3URL=https://datasheet.ciiva.com/15169/getdatasheetpartid-212174-15169929.pdf?src-supplier=Verical, ComponentLink4Description=https://datasheet.ciiva.com/16046/1715721-16046034.pdf?src-supplier=Onlinecomponents.com, ComponentLink4URL=https://datasheet.ciiva.com/16046/1715721-16046034.pdf?src-supplier=Onlinecomponents.com, Item Type="Terminal Blocks", Manufacturer Part Number=1715721, Pricing="1=0.94 (USD)", RoHS=Yes, Stock=13160, Supplier=Digikey
J2: "FUSE HOLDER BLADE 80V PCB", Current Rating=30A, LCSC Part Number=C207061, Manufacturer="Littelfuse Wickmann", Supplier Part Number=9883406, Body Material=4896ConductorMaterial, Category="Fuse Holders", ComponentLink1Description=https://datasheet.ciiva.com/295/littelfuse-ato-pcb-fuse-holders-178-6765-295568.pdf?src-supplier=Digikey, ComponentLink1URL=https://datasheet.ciiva.com/295/littelfuse-ato-pcb-fuse-holders-178-6765-295568.pdf?src-supplier=Digikey, ComponentLink2Description=https://datasheet.ciiva.com/4480/flrholder-58019-4480354.pdf?src-supplier=Mouser, ComponentLink2URL=https://datasheet.ciiva.com/4480/flrholder-58019-4480354.pdf?src-supplier=Mouser, ComponentLink3Description=https://datasheet.ciiva.com/16372/flrholder-16372408.pdf?src-supplier=Future+Electronics, ComponentLink3URL=https://datasheet.ciiva.com/16372/flrholder-16372408.pdf?src-supplier=Future+Electronics, ComponentLink4Description=https://datasheet.ciiva.com/15187/getdatasheetpartid-31610-15187861.pdf?src-supplier=Verical, ComponentLink4URL=https://datasheet.ciiva.com/15187/getdatasheetpartid-31610-15187861.pdf?src-supplier=Verical, Item Type="Fuse Holder", Lead Free=5697LeadFree, Manufacturer Part Number=178.6165.0002, Material=4896ConductorMaterial, Pricing="1=2.02, 40=1.96, 125=1.91, 400=1.86, 1250=1.77 (USD)", RoHS=Yes, Stock=3811, Supplier="Future Electronics", Thickness=6mm, Width=17.5mm
J3: "1x2P Barrier Block 2 1 16mm -40℃~+105℃ 76A 1kV Black 6~14 Straight pin 16 Plugin,P=16mm Barrier Terminal Blocks ROHS", LCSC Part Number=C707749, Manufacturer="CiXi KaiFeng Electronics", ComponentLink1Description=LCSC, ComponentLink1URL=https://www.lcsc.com/product-detail/Barrier-Terminal-Blocks_Cixi-Kefa-Elec-KF88SA-16-0-2P_C707749.html, Item Type="Terminal Block", Manufacturer Part Number=KF88SA-16.0-2P, RoHS=No, Supplier=LCSC
J4 J5 J14 J15: "1x2P Corner With Cover Plate 2 1 7.62mm -40℃~+105℃ 20A 300V Black 12~22 Straight Needle Plugin,P=7.62mm Barrier Terminal Blocks ROHS", LCSC Part Number=C496127, Manufacturer=DORABO, Package=Plugin,P=7.62mm, ComponentLink1Description=LCSC, ComponentLink1URL=https://www.lcsc.com/product-detail/Barrier-Terminal-Blocks_DORABO-DBT50G-7-62-2P-BK-P_C496127.html, Item Type="Terminal Block", Manufacturer Part Number=DBT50G-7.62-2P-BK-P
J6 J7 J16 J17: "CONN HDR RCPT 4POS VERT TIN PCB", Manufacturer=Molex, Supplier Part Number=538-44769-0401, ComponentLink1Description=https://datasheet.ciiva.com/3119/0447690401-pcb-receptacles-3119547.pdf?src-supplier=Avnet, ComponentLink1URL=https://datasheet.ciiva.com/3119/0447690401-pcb-receptacles-3119547.pdf?src-supplier=Avnet, Item Type="Female Socket", Manufacturer Part Number=0447690401, Pricing="1=1.49, 10=1.31, 50=1.31, 100=1.31, 1000=1.28, 10000=1.27 (USD)", RoHS=Yes, Stock=4246, Supplier=Mouser
J8 J9: "Conn Shrouded Header HDR 5 POS 2.5mm Solder ST Thru-Hole Box", Color=Natural, Contact Resistance=20mR, Current Rating=3A, Flammability Rating="UL94 V-0", Housing Color=White, Insulation Resistance=1GR, LCSC Part Number=C157991, Manufacturer=JST, Max Operating Temperature=85°C, Max Voltage Rating (AC)=250V, Min Operating Temperature=-25°C, Supplier Part Number 1=455-2270-ND, Category="Headers and Wire Housings", ComponentLink1Description=https://datasheet.ciiva.com/26894/getdatasheetpartid-455618-26894798.pdf?src-supplier=Verical, ComponentLink1URL=https://datasheet.ciiva.com/26894/getdatasheetpartid-455618-26894798.pdf?src-supplier=Verical, ComponentLink2Description=https://datasheet.ciiva.com/11746/0900766b8082f55f-11746654.pdf?src-supplier=RSComponents, ComponentLink2URL=https://datasheet.ciiva.com/11746/0900766b8082f55f-11746654.pdf?src-supplier=RSComponents, ComponentLink3Description=https://datasheet.ciiva.com/26894/getdatasheetpartid-640991-26894479.pdf?src-supplier=Verical, ComponentLink3URL=https://datasheet.ciiva.com/26894/getdatasheetpartid-640991-26894479.pdf?src-supplier=Verical, ComponentLink4Description=https://datasheet.ciiva.com/8052/1684882-8052063.pdf?src-supplier=Element14, ComponentLink4URL=https://datasheet.ciiva.com/8052/1684882-8052063.pdf?src-supplier=Element14, ComponentLink5Description=https://datasheet.ciiva.com/20207/523653-20207174.pdf?src-supplier=Rapid+Electronics, ComponentLink5URL=https://datasheet.ciiva.com/20207/523653-20207174.pdf?src-supplier=Rapid+Electronics, ComponentLink6Description=https://datasheet.ciiva.com/724/exh-724390.pdf?src-supplier=Digi-Key, ComponentLink6URL=https://datasheet.ciiva.com/724/exh-724390.pdf?src-supplier=Digi-Key, Connector Type=Header, Contact Finish - Mating=TIN, Contact Material=Brass, Contact Plating=Tin,Lead,Copper, Contact Post Length=0.134inch, Contact Shape=Square, Contact Type="Male Pin", Depth=5.75mm, Fastening Type=Detent, Gender=Male, Housing Material=Polyamide, Insulation Color=Natural, Insulation Height=0.276inch, Insulation Material=Nylon, Item Type="JST Connector", Lead Free="Lead Free", Lead Pitch=2.5mm, Length=14.9mm, Manufacturer Part Number=B5B-XH-A(LF)(SN), Mated Stacking Heights=9.8mm, Max Current Rating=3A, Mount="Through Hole", Number of Contacts=5, Number of Positions=5, Number of Rows=1, Orientation=Straight, Packaging=Bulk, Pitch=2.5mm, Pricing 1="1=0.25000, 10=0.23700, 100=0.16440, 500=0.13914, 1000=0.11383, 5000=0.10119, 10000=0.09170 (USD)", REACH SVHC="No SVHC", RoHS=Yes, Series=XH, Stock 1=1949, Supplier 1=Digi-Key, Termination=Press-Fit, Voltage Rating=250V, Voltage Rating (AC)=250V, Wire/Cable Gauge=22AWG
J10 J11 J12 J13: "2.54mm Single Row Gold 3A 2P Brass -40℃~+105℃ 250V 260℃ Direct Insert 1x2P 8.5mm Top Square Hole Plugin,P=2.54mm Female Headers ROHS", LCSC Part Number=C718243, Manufacturer="XKB Connectivity", Item Type="Female Header", Manufacturer Part Number=X6511FV-02-C85D32, RoHS=No, Supplier=LCSC
J18: "Conn Shrouded Header (4 Sides) HDR 2 POS 2.5mm Solder ST Thru-Hole Box", Color=Natural, Contact Resistance=20mR, Current Rating=3A, Housing Color=White, Insulation Resistance=1GR, LCSC Part Number=C158012, Manufacturer=JST, Max Operating Temperature=85°C, Max Voltage Rating (AC)=250V, Min Operating Temperature=-25°C, Supplier Part Number 1=1516276, Category="FFC / FPC", ComponentLink1Description=https://datasheet.ciiva.com/26894/getdatasheetpartid-640357-26894434.pdf?src-supplier=Verical, ComponentLink1URL=https://datasheet.ciiva.com/26894/getdatasheetpartid-640357-26894434.pdf?src-supplier=Verical, ComponentLink2Description=https://datasheet.ciiva.com/11746/0900766b8082653e-11746979.pdf?src-supplier=RSComponents, ComponentLink2URL=https://datasheet.ciiva.com/11746/0900766b8082653e-11746979.pdf?src-supplier=RSComponents, ComponentLink3Description=https://datasheet.ciiva.com/26894/getdatasheetpartid-385291-26894760.pdf?src-supplier=Verical, ComponentLink3URL=https://datasheet.ciiva.com/26894/getdatasheetpartid-385291-26894760.pdf?src-supplier=Verical, ComponentLink4Description=https://datasheet.ciiva.com/8052/5448-8052024.pdf?src-supplier=Element14, ComponentLink4URL=https://datasheet.ciiva.com/8052/5448-8052024.pdf?src-supplier=Element14, ComponentLink5Description=https://datasheet.ciiva.com/20207/523653-20207167.pdf?src-supplier=Rapid+Electronics, ComponentLink5URL=https://datasheet.ciiva.com/20207/523653-20207167.pdf?src-supplier=Rapid+Electronics, Connector Type="Male Pin", Contact Material=Brass, Contact Plating=Tin,Copper,Lead, Depth=5.75mm, Fastening Type=Detent, Housing Material=Polyamide, Item Type="JST Connector", Lead Free="Lead Free", Lead Pitch=2.5mm, Length=7.4mm, Manufacturer Part Number=B2B-XH-A(LF)(SN), Max Current Rating=3A, Max Voltage Rating (DC)=250V, Mount="Through Hole", Number of Contacts=2, Number of Positions=2, Number of Rows=1, Orientation=Straight, Packaging=Bulk, Pitch=2.5mm, Pricing 1="100=0.06860, 1000=0.04800, 2500=0.04520, 5000=0.04230, 10000=0.03950, 20000=0.03660 (GBP)", REACH SVHC="No SVHC", RoHS=Yes, Stock 1=219240, Supplier 1=Farnell, Termination=Solder, Voltage Rating=250V, Voltage Rating (AC)=250V, Wire/Cable Gauge=22AWG
K1 K2 K3 K4: "RELAY GEN PURPOSE SPST 20A 24V", LCSC Part Number=C231366, Manufacturer=Omron, ComponentLink1Description=https://omronfs.omron.com/en_US/ecb/products/pdf/en-g4a.pdf?src-supplier=Digikey, ComponentLink1URL=https://omronfs.omron.com/en_US/ecb/products/pdf/en-g4a.pdf?src-supplier=Digikey, ComponentLink2Description=https://datasheet.octopart.com/G4A-1A-PE-DC24-Omron-datasheet-8474777.pdf?src-supplier=Newark, ComponentLink2URL=https://datasheet.octopart.com/G4A-1A-PE-DC24-Omron-datasheet-8474777.pdf?src-supplier=Newark, ComponentLink3Description=https://datasheet.octopart.com/G4A-1A-PE-DC24-Omron-datasheet-151868987.pdf?src-supplier=Master+Electronics, ComponentLink3URL=https://datasheet.octopart.com/G4A-1A-PE-DC24-Omron-datasheet-151868987.pdf?src-supplier=Master+Electronics, Item Type=Relay, Manufacturer Part Number="G4A-1A-PE DC24", Pricing="20=4.964, 50=4.555, 100=4.412 (USD)", RoHS=Yes, Stock=435, Supplier="Arrow Electronics"
LED1 LED2 LED3 LED4: library part NCD0603B3, "blue 0603 Light Emitting Diodes (LED) ROHS", LCSC Part Number=C158101, Manufacturer="Foshan NationStar Optoelectronics", Package=0603, ComponentLink1Description=LCSC, ComponentLink1URL=https://www.lcsc.com/product-detail/Light-Emitting-Diodes-LED_Foshan-NationStar-Optoelectronics-NCD0603B3_C158101.html, Item Type=LED, Manufacturer Part Number=NCD0603B3
R1: library part MFR50SJT-52-100K, "Metal Film Resistors 100kΩ 500mW ±5% Plugin,D2.4xL6.3mm Through Hole Resistors ROHS", LCSC Part Number=C176621, Manufacturer=Yageo, ComponentLink1Description=https://datasheet.octopart.com/MFR50SJT-52-100K-Yageo-datasheet-175665672.pdf?src-supplier=Future+Electronics, ComponentLink1URL=https://datasheet.octopart.com/MFR50SJT-52-100K-Yageo-datasheet-175665672.pdf?src-supplier=Future+Electronics, ComponentLink2Description=https://datasheet.octopart.com/MFR50SJT-52-100K-Yageo-datasheet-165493774.pdf?src-supplier=Future+Electronics, ComponentLink2URL=https://datasheet.octopart.com/MFR50SJT-52-100K-Yageo-datasheet-165493774.pdf?src-supplier=Future+Electronics, ComponentLink3Description=https://datasheet.octopart.com/MFR50SJT-52-100K-Yageo-datasheet-28066692.pdf, ComponentLink3URL=https://datasheet.octopart.com/MFR50SJT-52-100K-Yageo-datasheet-28066692.pdf, Item Type=Resistor, Manufacturer Part Number=MFR50SJT-52-100K, Pricing="1=0.1, 10=0.071, 50=0.071, 100=0.029, 1000=0.012, 10000=0.008 (USD)", Stock=12355, Supplier=Mouser
R2 R3 R4 R5: library part RC0402FR-073K3L, "RES 3.3K OHM 1% 1/16W 0402", Case Code (Imperial)=0402, Case Code (Metric)=1005, LCSC Part Number=C137992, Manufacturer=Yageo, Max Operating Temperature=155°C, Max Power Dissipation=63mW, Min Operating Temperature=-55°C, Package Quantity=1, Power Rating=62.5mW, Resistance=3.3kR, Resistance Tolerance=1%, Resistor Type="Thick Film", Supplier Part Number 1=603-RC0402FR-073K3L, Temperature Coefficient=100ppm/°C, Voltage Rating=50V, Case/Package=0402, Category="Chip SMD Resistors", ComponentLink1Description=https://datasheet.ciiva.com/11808/0900766b80c66297-11808441.pdf?src-supplier=RSComponents, ComponentLink1URL=https://datasheet.ciiva.com/11808/0900766b80c66297-11808441.pdf?src-supplier=RSComponents, ComponentLink2Description=https://datasheet.ciiva.com/46394/1018594-46394940.pdf?src-supplier=Element14, ComponentLink2URL=https://datasheet.ciiva.com/46394/1018594-46394940.pdf?src-supplier=Element14, ComponentLink3Description=https://datasheet.ciiva.com/2453/pyu-r-int-thick-7-2453395.pdf?src-supplier=Digi-Key, ComponentLink3URL=https://datasheet.ciiva.com/2453/pyu-r-int-thick-7-2453395.pdf?src-supplier=Digi-Key, ComponentLink4Description=https://datasheet.ciiva.com/2453/pyu-r-int-thick-7-2453396.pdf?src-supplier=Digi-Key, ComponentLink4URL=https://datasheet.ciiva.com/2453/pyu-r-int-thick-7-2453396.pdf?src-supplier=Digi-Key, ComponentLink5Description=https://datasheet.ciiva.com/2453/pyu-r-int-thick-7-2453394.pdf?src-supplier=Digi-Key, ComponentLink5URL=https://datasheet.ciiva.com/2453/pyu-r-int-thick-7-2453394.pdf?src-supplier=Digi-Key, ComponentLink6Description=https://datasheet.ciiva.com/16746/pyu-rc0402-51-rohs-l-6-r-16746361.pdf?src-supplier=Future+Electronics, ComponentLink6URL=https://datasheet.ciiva.com/16746/pyu-rc0402-51-rohs-l-6-r-16746361.pdf?src-supplier=Future+Electronics, Construction=Rectangular, Depth=0.5mm, Features="Moisture Resistant", Height=0.016inch, Item Type=Resistor, Lead Free="Lead Free", Length=1mm, Manufacturer Part Number=RC0402FR-073K3L, Military Standard=Not, Number of Pins=2, Number of Terminations=2, Packaging="Tape and Reel", Pricing 1="1=0.10000, 10=0.01400, 50=0.01400, 100=0.00600, 1000=0.00300, 5000=0.00200, 10000=0.00100 (USD)", REACH SVHC="No SVHC", RoHS=Yes, RoHS Compliant=Yes, Series=RC, Size Code=0402, Stock 1=2413047, Supplier 1=Mouser, Technology="THICK FILM", Termination=SMD/SMT, Tolerance=1%, Voltage Rating (DC)=50V, Width=0.5mm
U1: "70V 5kV 50mA 100mV@1mA,20mA 1 6V 1.2V DC SMD-4 Transistor Output Optocoupler ROHS", LCSC Part Number=C2936043, Manufacturer=Slkor, Package=SMD-4, ComponentLink1Description=LCSC, ComponentLink1URL=https://www.lcsc.com/product-detail/Transistor-Output-Optocoupler_Slkor-SLKORMICRO-Elec-PC817C_C2936043.html, Item Type=IC, Manufacturer Part Number=PC817C
U2: "IC PWR RELAY 7NPN 1:1 16SOIC", Manufacturer="Texas Instruments", Supplier Part Number=595-ULN2003AIDR, ComponentLink1Description=https://datasheet.ciiva.com/15139/getdatasheetpartid-47948-15139878.pdf?src-supplier=Verical, ComponentLink1URL=https://datasheet.ciiva.com/15139/getdatasheetpartid-47948-15139878.pdf?src-supplier=Verical, ComponentLink2Description=https://datasheet.ciiva.com/14424/ulq2003a-14424030.pdf?src-supplier=Avnet, ComponentLink2URL=https://datasheet.ciiva.com/14424/ulq2003a-14424030.pdf?src-supplier=Avnet, ComponentLink3Description=https://datasheet.ciiva.com/1700/uln2003ai-1700820.pdf?src-supplier=Digikey, ComponentLink3URL=https://datasheet.ciiva.com/1700/uln2003ai-1700820.pdf?src-supplier=Digikey, ComponentLink4Description=https://datasheet.ciiva.com/1700/uln2003ai-1700821.pdf?src-supplier=Digikey, ComponentLink4URL=https://datasheet.ciiva.com/1700/uln2003ai-1700821.pdf?src-supplier=Digikey, ComponentLink5Description=https://datasheet.ciiva.com/1700/uln2003ai-1700822.pdf?src-supplier=Digikey, ComponentLink5URL=https://datasheet.ciiva.com/1700/uln2003ai-1700822.pdf?src-supplier=Digikey, Item Type=IC, Manufacturer Part Number=ULN2003AIDR, Pricing="1=0.66, 10=0.589, 50=0.589, 100=0.402, 1000=0.285, 10000=0.232 (USD)", RoHS=Yes, Stock=2012, Supplier=Mouser

## Free pads (board coordinates)
  round 511.81 hole 314.96: MH(0,7263) MH(0,0) MH(9808,0) MH(9808,7263)

## Via types
v1: diameter 23.62, hole 11.81, Top Layer to Bottom Layer, 329 vias
v2: diameter 23.62, hole 11.81, Top Layer to Bottom Layer, tented both sides, 21 vias

## Nets (pads, with @x,y where several pads share a name; then routed paths per layer and width w, separated by ;. In a path a pad name is that pad's centre, name@x,y a point inside that pad or via, vN(x,y) a via of type N, cw(c..) or ccw(c..) an arc to the next point about the centre after c; other vN are vias at no path point)
+24V: D3.1 K1.2 K2.2 K3.2 K4.2 R2.1 R3.1 R4.1 R5.1 U2.9 | length 1884.5
  Top Layer w20: 1221.19,4700 1238.86,4700 R2.1@1401.31,4700 ; 3499.86,4700 3517.53,4700 R3.1@3684.81,4700 ; 5756,4700.01 5797.2,4700.01 ; 5779.53,4700 5797.2,4700 ; R4.1@5963.5,4700.01 5797.2,4700.01 ; 7905.19,4700 R5.1@8088.81,4700 R5.1@8089.16,4700.01 ; 8005.67,4700.01 R5.1@8087.81,4700.01
  Top Layer w25: K1.2@1168.3,4868.78 1182.76,4854.32 K1.2@1182.76,4811.21 ; K1.2@1168.43,4812.72 1181.25,4812.72 K1.2@1182.76,4811.21 ; 1229.05,4710.18 1182.76,4756.47 1182.76,4776.11 ; 1245.36,4684.21 1238.86,4690.71 1238.86,4700 1238.86,4720 1182.76,4776.11 ; K2.2@3446.97,4868.78 3461.42,4854.32 K2.2@3461.42,4811.21 ; K2.2@3447.1,4812.72 3459.92,4812.72 K2.2@3461.42,4811.21 ; 3507.71,4710.18 3461.42,4756.47 3461.42,4776.11 ; 3524.03,4684.21 3517.53,4690.71 3517.53,4700 3517.53,4720 3461.42,4776.11 ; K3.2@5726.63,4868.78 5741.09,4854.32 K3.2@5741.09,4811.21 ; K3.2@5726.76,4812.72 5739.58,4812.72 K3.2@5741.09,4811.21 ; 5787.38,4710.18 5741.09,4756.47 5741.09,4776.11 ; 5803.7,4684.21 5797.2,4690.71 5797.2,4700 5797.2,4720 5741.09,4776.11 ; K4.2@7852.3,4868.78 7866.76,4854.32 7866.76,4811.21 7865.25,4812.72 K4.2@7852.43,4812.72 ; 1182.76,4776.11 K1.2@1182.76,4811.21 ; 3461.42,4776.11 K2.2@3461.42,4811.21 ; 5741.09,4776.11 K3.2@5741.09,4811.21
  other v1: 9107.76,1117 9219,1117 589.47,1558 690.13,1585.76 690.13,1633 1120,1636 1214,1637 3404,1637 7801,1637 3498,1638 7895,1638 5678,1640 5772,1641 690.13,1680.24 1120,1707 1214,1708 3404,1708 7801,1708 589.47,1709 3498,1709 7895,1709 5678,1711 5772,1712
GND: C1.2 C2.2 C3.2 D2.1 J1.2 J8.5 J9.5 J10.2 J11.2 J12.2 J13.2 J18.1 U1.3 U2.8
  other v1: 643,-205 731,-121 643,-33 643,100 743.66,127.76 743.66,175 743.66,222.24 643,251 622.84,400.55 666.04,400.55 710.24,400.55 754.44,400.55 622.84,834.55 666.04,834.55 710.24,834.55 754.44,834.55 9320.35,1117 9431.6,1117 622.84,1271.55 666.04,1271.55 710.24,1271.55 754.44,1271.55 3373,1437 2350,1445 5473,1460 8144,1579 765.74,2079.51 -134.26,2089.51 9609.02,2801.98 9609.02,2846.91 9536,2886 9585.93,2886
IN-1: J8.1 U2.1 | length 753.5
  Top Layer w25: U2.1@9377.3,768 9445,768 9717.7,495.3 J8.1@10017.88,495.3
IN-2: J8.2 U2.2 | length 733.5
  Top Layer w25: U2.2@9377.3,818 9472,818 9696.28,593.72 J8.2@10017.88,593.72
IN-3: J8.3 U2.3 | length 713.4
  Top Layer w25: U2.3@9377.3,868 9503,868 9678.85,692.15 J8.3@10017.88,692.15
IN-4: J8.4 U2.4 | length 693.4
  Top Layer w25: U2.4@9377.3,918 9517,918 9644.43,790.57 J8.4@10017.88,790.57
LIVE: D1.4 J3.1 K1.3 K2.3 K3.3 K4.3 | length 92.5
  Top Layer w10: 9976,2780 9994.62,2761.38 10010.62,2761.38 D1.4@10010.62,2711.2
  other v1: 9869.5,2738.49 10117.06,2738.49 9869.5,2818.35 9949.35,2818.35 10037.2,2818.35 10117.06,2818.35 1020.9,5227.53 3299.57,5227.53 5579.24,5227.53 7704.9,5227.53 905,5339 3183.66,5339 5463.33,5339 7589,5339 1132.38,5343.44 3411.04,5343.44 5690.71,5343.44 7816.37,5343.44 1016.47,5456.71 3295.14,5456.71 5574.8,5456.71 7700.47,5456.71 -306.01,5496.3 -173.19,5496.3 -173.19,5496.3 -40.38,5496.3 -40.38,5496.3 92.43,5496.3 225.24,5496.3 225.24,5496.3 358.05,5496.3 490.86,5496.3 490.86,5496.3 490.86,5496.3 623.67,5496.3 623.67,5496.3 -173.19,5629.11 490.86,5629.11 623.67,5629.11 -306.01,5761.92 -306.01,5761.92 -173.19,5761.92 -173.19,5761.92 490.86,5761.92 490.86,5761.92 490.86,5761.92 623.67,5761.92 623.67,5761.92 -306.01,5894.73 -173.19,5894.73 490.86,5894.73 623.67,5894.73
  other v2: -306.01,5496.3 -306.01,5629.11
NetC1_1: C1.1 C2.1 C3.1 D3.2 J2.3 J2.4 J2.5 J2.6
  other v1: 307.88,400.55 351.08,400.55 395.28,400.55 439.48,400.55 307.88,834.55 351.08,834.55 395.28,834.55 439.48,834.55 307.88,1271.55 351.08,1271.55 395.28,1271.55 439.48,1271.55 433.75,1558 333.09,1585.76 333.09,1633 333.09,1680.24 433.75,1709
NetD1_1: D1.1 R1.1
NetD1_2: D1.2 U1.2
NetD2_2: D2.2 J1.1 J2.1 J2.2 J2.7 J2.8
  other v1: 443,-205 355,-121 443,-33 463.66,100 363,127.76 363,175 363,222.24 463.66,251
NetLED1_1: LED1.1 R2.2 | length 42
  Top Layer w18: R2.2@1444.18,4700 LED1.1@1486.16,4700
NetLED2_1: LED2.1 R3.2 | length 42
  Top Layer w18: R3.2@3722.81,4700 LED2.1@3764.78,4700
NetLED3_1: LED3.1 R4.2
NetLED4_1: LED4.1 R5.2
NetR1_2: R1.2 U1.1
NEUTRAL: D1.3 J3.2 J4.2 J5.2 J6.1 J6.3 J7.1 J7.3 J14.2 J15.2 J16.1 J16.3 J17.1 J17.3 | length 92.5
  Top Layer w10: 9976,2441.92 9994.62,2460.54 10010.62,2460.54 D1.3@10010.62,2510.72
  other v1: 9869.5,2396.29 9949.35,2396.29 10037.2,2396.29 10117.06,2396.29 9869.5,2476.14 10117.06,2476.14 10118.96,2993.18 10118.96,3125.99 10118.96,3258.8 10118.96,3391.61 10118.96,3524.43 10118.96,3657.24 10118.96,3790.05 10118.96,3922.86 10118.96,4055.67 10118.96,4188.48 10118.96,4321.29 10118.96,4454.1 10118.96,4586.91 10118.96,4719.72 10118.96,4852.53 10118.96,4985.34 10118.96,5118.15 10114,5260 10114,5392.81 10114,5525.62 10114,5658.43 10114,5791.24 10114,5924.05 10114,6056.86 10114,6189.68 -306.01,6231.35 -173.19,6231.35 490.86,6231.35 623.67,6231.35 10114,6322.49 -306.01,6364.16 -173.19,6364.16 -173.19,6364.16 490.86,6364.16 490.86,6364.16 490.86,6364.16 623.67,6364.16 623.67,6364.16 10114,6455.3 -173.19,6496.97 490.86,6496.97 623.67,6496.97 10114,6588.11 -306.01,6629.78 -173.19,6629.78 -173.19,6629.78 -40.38,6629.78 -40.38,6629.78 92.43,6629.78 225.24,6629.78 225.24,6629.78 358.05,6629.78 490.86,6629.78 490.86,6629.78 490.86,6629.78 623.67,6629.78 623.67,6629.78 10114,6720.92 -306.01,6762.59 10114,6853.73 -306.01,6895.4 -306.01,6895.4 10114,6986.54 -306.01,7028.21 10114,7119.35 -306.01,7161.03 10114,7252.16 -306.01,7293.84 10114,7384.97 -306.01,7426.65 10114,7517.78 -296.46,7569 -163.65,7569 -30.84,7569 101.97,7569 234.78,7569 367.59,7569 500.4,7569 633.21,7569 766.03,7569 766.03,7569 898.84,7569 1031.65,7569 1164.46,7569 1562.89,7569 1695.7,7569 1828.51,7569 1961.32,7569 1961.32,7569 2094.13,7569 2226.94,7569 2359.76,7569 2492.57,7569 2625.38,7569 2758.19,7569 2891,7569 2891,7569 3023.81,7569 3156.62,7569 3289.43,7569 3422.24,7569 3820.67,7569 4086.3,7569 4219.11,7569 4351.92,7569 4484.73,7569 4617.54,7569 4750.35,7569 4883.16,7569 5015.97,7569 5148.78,7569 5281.59,7569 5281.59,7569 5414.4,7569 5547.21,7569 5680.03,7569 6211.27,7569 6476.89,7569 6476.89,7569 6609.7,7569 6742.51,7569 6875.32,7569 7008.13,7569 7140.94,7569 7273.75,7569 7406.57,7569 7539.38,7569 7672.19,7569 7672.19,7569 7805,7569 8336.24,7569 8601.86,7569 8734.67,7569 8867.48,7569 8867.48,7569 9000.3,7569 9133.11,7569 9265.92,7569 9398.73,7569 9531.54,7569 9664.35,7569 9797.16,7569 9929.97,7569 10062.78,7569
  other v2: -306.01,6364.16 -306.01,6496.97 -306.01,6629.78 1297.27,7569 1430.08,7569 1695.7,7569 1828.51,7569 3555.05,7569 3687.86,7569 3953.48,7569 4086.3,7569 5812.84,7569 5945.65,7569 6078.46,7569 6344.08,7569 7937.81,7569 8070.62,7569 8203.43,7569 8469.05,7569
RELAY-1: K1.1 LED1.2 U2.16 | length 11919
  Top Layer w25: K1.1@2034.44,4868.78 2034.44,1438.56 2132,1341 v1(2704,1341) ; 2036,3605 2036,4488.16 ; v1@7248,768 U2.16@9164.7,768
  Bottom Layer w25: v1(2704,1341) 2704,1002 2938,768 v1(7247,768)
RELAY-2: K2.1 LED2.2 U2.15 | length 8718.5
  Top Layer w25: K2.1@4313.1,4868.78 4313.1,4699.5 4313.1,1531.9 4382.6,1462.4 v1(4982.67,1462.4) ; v1(7247,818) U2.15@9164.7,818
  Bottom Layer w25: v1(4982.67,1462.4) 4982.67,1062.33 5227,818 v1(7247,818)
RELAY-3: K3.1 LED3.2 U2.14 | length 6529.5
  Top Layer w25: K3.1@6592.77,4868.78 6592.77,1608.23 6666.54,1534.46 v1(7247,1534.46) ; v1(7247,868) U2.14@9164.7,868
  Bottom Layer w25: v1(7247,868) v1(7247,1534.46)
RELAY-4: K4.1 LED4.2 U2.13 | length 4308
  Top Layer w25: K4.1@8718.57,4812.72 8723.49,4812.72 8725,4811.21 8725,4699.5 8725,1688 8779,1634 v1(9033,1634) ; v1(9033,918) U2.13@9164.7,918
  Bottom Layer w25: v1(9033,918) v1@9033,1633.6
RLY-PWR-1: J4.1 J6.2 J6.4 K1.4 | length 118
  Top Layer w25: J6.2@1454,3802 J6.4@1572,3802
  other v1: 2103.09,5227.53 2219,5339 1991.62,5343.44 2107.52,5456.71 1666.57,6961 1770.38,6961 1874.19,6961 1878.15,7070.12 1878.15,7179.23
RLY-PWR-2: J5.1 J7.2 J7.4 K2.4
  other v1: 4381.76,5227.53 4497.67,5339 4270.29,5343.44 4270.28,5345.24 4386.19,5456.71 3945.23,6961 4049.05,6961 4152.86,6961 4156.81,7070.12 4156.81,7179.23
RLY-PWR-3: J14.1 J16.2 J16.4 K3.4
  other v1: 6661.42,5227.53 6777.33,5339 6549.95,5343.44 6665.86,5456.71 6224.9,6961 6328.71,6961 6432.52,6961 6436.48,7070.12 6436.48,7179.23
RLY-PWR-4: J15.1 J17.2 J17.4 K4.4
  other v1: 8787.09,5227.53 8903,5339 8675.62,5343.44 8791.52,5456.71 8350.57,6961 8454.38,6961 8558.19,6961 8562.15,7070.12 8562.15,7179.23
TRIG-1: J9.1 J10.1 | length 9117.8
  Top Layer w25: J10.1@1677,2141 1837,2141 1939,2039 1939,1353.38 2057.38,1235 J9.1@10017.88,1235
TRIG-2: J9.2 J12.1 | length 6740.4
  Top Layer w25: J12.1@3959.33,2141 4115,2141 4216,2040 4216,1447 4329.58,1333.42 J9.2@10017.88,1333.42
TRIG-3: J9.3 J11.1 | length 4349
  Top Layer w25: J11.1@6242.66,2141 6390,2141 6491,2040 6491,1562 6621.15,1431.85 J9.3@10017.88,1431.85
TRIG-4: J9.4 J13.1 | length 2128.3
  Top Layer w25: J13.1@8372,2141 8537,2141 8649,2029 8649,1641 8759.73,1530.27 J9.4@10017.88,1530.27
  Bottom Layer w25: J9.4@10017.88,1530.27 J9.4@10020,1530.27
ZERO_CROSS: J18.2 U1.4
  other v1: 9419,2886 9468.93,2886
pads on no net: J2. J6.5 J6.6 J7.5 J7.6 J16.5 J16.6 J17.5 J17.6 U2.5 U2.6 U2.7 U2.10 U2.11 U2.12

## Polygon pours and split planes (outlines as drawn)
LIVE on Top Layer "NONET_L-01_P-001" (solid, remove dead copper, pour order 16): 9765,2648 9765,2971 9161,2971 9161,5113 7212.33,5113 7212.33,5546 5940,5546 5940,5113 4932.67,5113 4932.67,5546 3651,5546 3651,5113 2669,5113 2669,5546 1375,5546 1375,5113 -365,5113 -365,7628 10172,7628 10172,2648
GND on Top Layer "NONET_L-01_P-001" (solid, remove dead copper, pour order 18): -361,2256.96 10166,2256.96 10166,-364 -361,-364
NetD2_2 on Top Layer "NONET_L-01_P-001" (solid, remove dead copper, pour order 0): 246,296 309.13,232.87 547,232.87 547,-364 -361,-364 -361,933.19 246,933.19
NetC1_1 on Top Layer "NONET_L-01_P-001" (solid, remove dead copper, pour order 1): 521,293 286,293 286,969 -364,969 -364,1791 521,1791
NEUTRAL on Bottom Layer "NEUTRAL_L04_P022" (solid, remove dead copper, pour order 22): 8269.25,2450.25 9108.25,2450.25 9108.25,2971 9745,2971 9745,2327 10172,2327 10172,7629 -365,7629 -365,2450.25
GND on Bottom Layer "NONET_L-01_P-001" (solid, remove dead copper, pour order 23): -363,2214 10165,2214 10165,-362 -363,-362
RLY-PWR-1 on Bottom Layer "NONET_L-01_P-001" (solid, remove dead copper, pour order 5): 1593.5,7213 2654,7213 2654,3575 1364,3575 1364,3861 1589,3861 1593.5,3865.5
RLY-PWR-2 on Bottom Layer "NONET_L-01_P-001" (solid, remove dead copper, pour order 19): 3872.16,7213 4932.67,7213 4932.67,3575 3642.67,3575 3642.66,3575 3642.66,3861 3867.67,3861 3872.16,3865.5
RLY-PWR-3 on Bottom Layer "NONET_L-01_P-001" (solid, remove dead copper, pour order 20): 6151.83,7213 7212.33,7213 7212.33,3575 5922.33,3575 5922.33,3861 6147.33,3861 6151.83,3865.5
RLY-PWR-4 on Bottom Layer "NONET_L-01_P-001" (solid, remove dead copper, pour order 21): 8277.5,7213 9338,7213 9338,3575 8048,3575 8048,3861 8273,3861 8277.5,3865.5
NEUTRAL on Layer 2 (split plane): 10177.9,2282.1 -369.9,2282.1 -369.91,7634.9 10177.9,7634.9
GND on Layer 2 (split plane): 10177.9,-371.9 -369.9,-371.9 -369.9,2241.9 10177.9,2241.9
NetD2_2 on Layer 1 (split plane): 211.93,309 212.22,306.06 213.07,303.23 214.47,300.63 216.34,298.34 218.62,296.47 221.23,295.07 224.06,294.22 227,293.93 547.93,293.93 547.93,-371.9 -369.9,-371.9 -369.9,933.96 211.93,933.96
NetC1_1 on Layer 1 (split plane): 547.93,324.07 242.07,324.07 242.07,949.03 241.78,951.97 240.92,954.8 239.53,957.4 237.66,959.69 235.37,961.56 232.77,962.95 229.94,963.81 227,964.1 -369.9,964.1 -369.9,1775.93 547.93,1775.93
LIVE on Layer 1 (split plane): 10177.9,-371.9 578.07,-371.9 578.07,309 578.07,1791 577.78,1793.94 576.93,1796.77 575.53,1799.37 573.66,1801.66 571.37,1803.53 568.77,1804.93 565.94,1805.78 563,1806.07 -369.9,1806.07 -369.91,7634.9 10177.9,7634.9
RLY-PWR-3 on Layer 1 (split plane): 7197.26,3590.07 5937.41,3590.07 5937.41,3847.93 6149.33,3847.93 6152.27,3848.22 6155.1,3849.07 6157.71,3850.47 6159.99,3852.34 6161.87,3854.63 6163.26,3857.23 6164.12,3860.06 6164.41,3863 6164.21,3865 6164.41,3867 6164.41,7197.93 7197.26,7197.93
RLY-PWR-4 on Layer 1 (split plane): 9322.93,3590.07 8063.07,3590.07 8063.07,3847.93 8275,3847.93 8277.94,3848.22 8280.77,3849.07 8283.37,3850.47 8285.66,3852.34 8287.53,3854.63 8288.93,3857.23 8289.78,3860.06 8290.07,3863 8289.88,3865 8290.07,3867 8290.07,7197.93 9322.93,7197.93
RLY-PWR-1 on Layer 1 (split plane): 2638.93,3590.07 1379.07,3590.07 1379.07,3847.93 1591,3847.93 1593.94,3848.22 1596.77,3849.07 1599.37,3850.47 1601.66,3852.34 1603.53,3854.63 1604.93,3857.23 1605.78,3860.06 1606.07,3863 1605.88,3865 1606.07,3867 1606.07,7197.93 2638.93,7197.93
RLY-PWR-2 on Layer 1 (split plane): 4917.59,3590.07 3657.74,3590.07 3657.74,3847.93 3869.67,3847.93 3872.61,3848.22 3875.43,3849.07 3878.04,3850.47 3880.32,3852.34 3882.2,3854.63 3883.59,3857.23 3884.45,3860.06 3884.74,3863 3884.54,3865 3884.74,3867 3884.74,7197.93 4917.59,7197.93

## Other copper
Top Layer:
  region net +24V: 7763,4955 7763,1579.56 7941.86,1579.56 7941.86,4955
  region net +24V: 5637.33,4955 5637.33,1579 5816.2,1579 5816.2,4955
  rectangle net RLY-PWR-4: 8299,6921 8607,7227.02
  rectangle net RLY-PWR-3: 6173.33,6921 6480,7227.02
  rectangle net RLY-PWR-1: 1615,6921 1925,7227.02
  rectangle net RLY-PWR-2: 3893.67,6921 4200,7227.02
  rectangle net RLY-PWR-4: 8640,5195 8939,5486
  rectangle net RLY-PWR-3: 6514.33,5195 6813.33,5486
  rectangle net RLY-PWR-2: 4234.67,5195 4533.67,5486
  rectangle net RLY-PWR-2: 4234.66,5196.8 4533.66,5487.8
  rectangle net RLY-PWR-1: 1956,5195 2255,5486
  region net +24V: 3357.66,4955 3357.66,1579 3536.53,1579 3536.53,4955
  region net +24V: 1079,4955 1079,1094 1257.86,1094 1257.86,4955
  rectangle net NEUTRAL: 9765,2350 10166,2555.25
  region net GND: 9513.62,2902.86 9513.62,2779.63 9630,2779.63 9630,2902.86
  region net ZERO_CROSS: 9393.8,2902.84 9393.8,2779.61 9492,2779.61 9492,2902.84
  region net RELAY-1: 1945.14,4955 1945.14,4670.45 2124,4670.45 2124,4955
  rectangle net NetLED1_1: 1432.81,4680.31 1493.63,4719.68
  region net RELAY-1: 2114,4729 1535.32,4729 1535.32,4670 2114,4670
  region net RELAY-2: 4223.8,4955 4223.8,4670.45 4402.67,4670.45 4402.67,4955
  rectangle net NetLED2_1: 3711.48,4680.31 3772.29,4719.68
  region net RELAY-2: 4392.67,4729 3813.99,4729 3813.99,4670 4392.67,4670
  region net RELAY-3: 6503.47,4955 6503.47,4670.45 6682.33,4670.45 6682.33,4955
  rectangle net NetLED3_1: 5991.15,4680.31 6051.96,4719.68
  region net RELAY-3: 6672.33,4729 6093.65,4729 6093.65,4670 6672.33,4670
  rectangle net NetR1_2: 9254,2349 9477.43,2472
  region net NetD1_1: 9256,2874 9256,2647.24 9372.25,2647.24 9372.25,2874
  region net NetD1_1: 9712.59,2756.46 9256,2756.46 9256,2647.95 9712.59,2647.95
  region net NetD1_2: 9726.78,2348.46 9726.78,2547.85 9603.78,2547.85 9603.78,2348.46
  region net NetD1_2: 9712.59,2471.46 9504.57,2471.46 9504.57,2348.46 9712.59,2348.46
  rectangle net NetLED1_1: 1435.18,4680.31 1496,4719.68
  rectangle net NetLED2_1: 3713.81,4680.31 3774.63,4719.68
  region net RELAY-4: 8798,4729 8219.32,4729 8219.32,4670 8798,4670
  rectangle net NetLED4_1: 8116.81,4680.31 8177.63,4719.68
  region net RELAY-4: 8629.14,4955 8629.14,4670.45 8808,4670.45 8808,4955
  rectangle net NetD2_2: 274.56,122 547,268
  region net GND: 9411.24,1142 9299.6,1142 9299.6,1093 9411.24,1093
  rectangle net GND: 9343.36,1093 9455,1142
  rectangle net +24V: 9130.76,1093 9242.4,1142
  region net +24V: 9198.64,1142 1159,1142 1159,1093 9198.64,1093
  rectangle net +24V: 543,1505 1257,1796
Bottom Layer:
  rectangle net +24V: 9067,1085.19 9256.82,1152
  rectangle net +24V: 533.14,1516.01 735.14,1754
  region net LIVE: 7852,5486 7553,5486 7553,5195 7852,5195
  region net LIVE: 5726.33,5486 5427.33,5486 5427.33,5195 5726.33,5195
  region net LIVE: 3446.66,5486 3147.66,5486 3147.66,5195 3446.66,5195
  region net +24V: 7942,1758.42 1078,1758.42 1078,1579.56 7942,1579.56
  region net LIVE: 1168,5486 869,5486 869,5195 1168,5195
  region net GND: 10174,2230.13 9523,2230.13 9523,2111 10174,2111
  region net GND: 9630.13,2137 9630.13,2904.87 9521.62,2904.87 9521.62,2137
  region net ZERO_CROSS: 10142.72,2087.31 9391.8,2087.31 9391.8,1978.8 10142.72,1978.8
  region net ZERO_CROSS: 9500.31,2023 9500.31,2904.87 9391.8,2904.87 9391.8,2023
  pour cut-out: 7645.61,5047 8064,5047 8064,4665 8064,4652 7647.6,4652 7645.61,4650.01
  pour cut-out: 5519.95,5047 5938.33,5047 5938.33,4665 5938.33,4652 5521.94,4652 5519.95,4650.01